# Altium PCB Embedded-DCAC-UPS-PoC.PcbDoc (part 2 of 2)
Units mm, origin at the board's own origin, x right, y up, seen from the top; angles counter-clockwise.
Board outline 165 x 165 mm, 2 copper layers (Top Layer, Bottom Layer), stack 1.58 mm thick; 80 components, 51 nets, 294 pads, 58 vias.
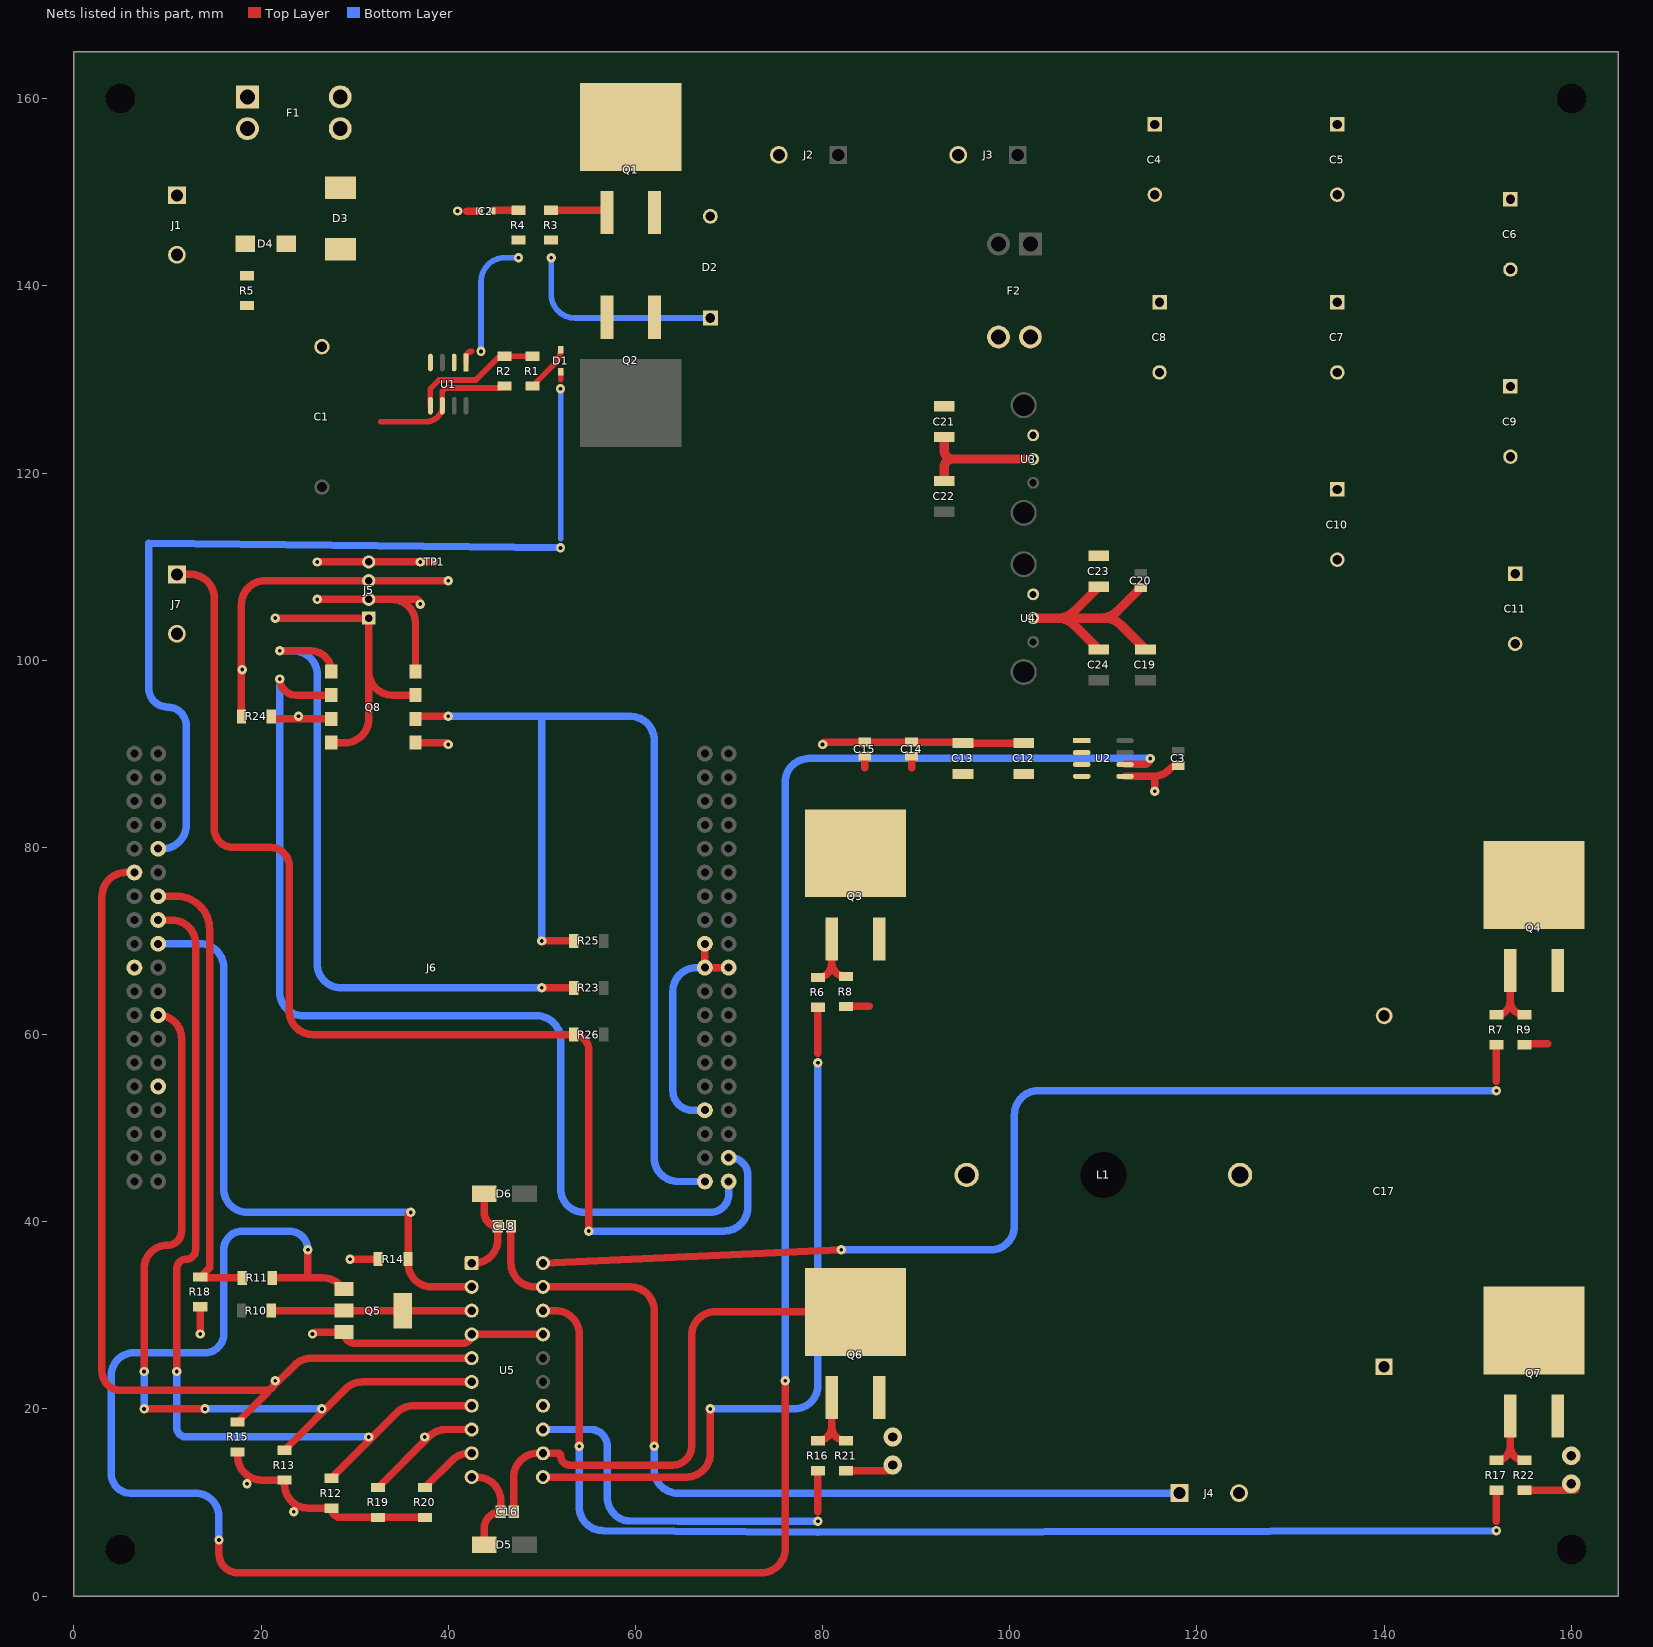
[diagram p2: the nets of this part, all layers, seen from the top]

## Via types
v1: diameter 1, hole 0.4, Top Layer to Bottom Layer, 54 vias
v2: diameter 2, hole 1, Top Layer to Bottom Layer, 4 vias

## Nets (pads, with @x,y where several pads share a name; then routed paths per layer and width w, separated by ;. In a path a pad name is that pad's centre, name@x,y a point inside that pad or via, vN(x,y) a via of type N, cw(c..) or ccw(c..) an arc to the next point about the centre after c; other vN are vias at no path point) (continued)
BAT_OUT-: C3.2 C4.1 C5.1 C6.1 C7.1 C8.1 C9.1 C10.1 C11.1 C12.2 C13.2 C14.1 C15.1 C19.2 C20.1 C21.1 C22.1 C23.1 C24.1 J3.2 J6.8 J6.19 J6.20 J6.22 J6.47 J6.58 J7.2 Q5.3 Q6.3 Q7.3 Q8.5 R12.1 R13.1 R14.1 R15.1 R18.2 R19.2 R20.2 R21.2 R22.2 U2.5 U3.2 U4.2 U5.4 U5.14 U5.17 | length 168.4
  Top Layer w0.8: 13.5,28.5 R18.2@13.5,30.9 ; R15.1@17.5,15.4 17.5,14.94 ccw(c20.04,14.94) 20.04,12.4 R13.1@22.5,12.4 22.5,11.94 ccw(c25.04,11.94) 25.04,9.4 R12.1@27.5,9.4 ccw(c28.5,9.4) 28.5,8.4 R19.2@32.5,8.4 R20.2@37.5,8.4 ; v1(25.5,28) cw(c25.983,27.517) 25.983,28.2 Q5.3@28.85,28.2 ccw(c30.05,28.2) 30.05,27 41.54,27 ccw(c41.54,27.96) U5.4@42.5,27.96 U5.17@50.12,27.96 ; v1(29.5,36) R14.1@32.5,36 ; Q8.5@36.5,91.19 39.81,91.19 cw(c39.81,91) v1(40,91) ; J6.22@67.42,69.7 J6.20@67.42,67.16 J6.19@69.96,67.16 ; v1(80,91) cw(c80.25,91) 80.25,91.25 C15.1@84.5,91.25 C14.1@89.5,91.25 94.9,91.25 cw(c94.9,91.15) C13.2@95,91.15 C12.2@101.5,91.15 ; R21.2@82.5,13.4 86.9,13.4 ccw(c86.9,14) v2(87.5,14) ; U2.5@112.316,87.595 115.293,87.595 ; v1(115.5,86) 115.5,87.095 ccw(c114.793,87.095) 115.293,87.595 ; C3.2@117.5,88.75 117.089,88.339 cw(c115.293,90.135) 115.293,87.595 ; R22.2@155,11.3 160.3,11.3 ccw(c160.3,11.5) v2@160.5,11.5
  Top Layer w1: C22.1@93,119.15 93,120.65 cw(c93.85,120.65) 93.85,121.5 ; C21.1@93,123.85 93,122.35 ccw(c93.85,122.35) 93.85,121.5 ; U4.2@102.5,104.5 110.098,104.5 cw(c110.098,101.96) 111.894,103.756 C19.2@114.5,101.15 ; U3.2@102.5,121.5 93.85,121.5 ; C24.1@109.5,101.15 106.894,103.756 ccw(c105.098,101.96) 105.098,104.5 ccw(c105.098,107.04) 106.894,105.244 C23.1@109.5,107.85 ; 110.093,104.531 ccw(c109.698,107.04) 111.494,105.244 C20.1@114,107.75
  Bottom Layer w0.8: J6.8@67.42,51.92 66.08,51.92 cw(c66.08,54) 64,54 64,64.62 cw(c66.54,64.62) 66.54,67.16 J6.20@67.42,67.16
  other v1: 23.5,9 18.5,12 13.5,28
  other v2: 160,12 160,15 87.5,17
BRIDGE_EN: J6.63 R11.1 R18.1 | length 49.7
  Top Layer w0.8: J6.63@9,74.78 10.96,74.78 cw(c10.96,71.24) 14.5,71.24 14.5,35.1 13.85,34.45 13.85,34.2 13.75,34.1 R18.1@13.5,34.1 ccw(c13.741,34.341) 13.741,34 R11.1@18,34
BUT_CTRL: J6.3 J7.1 R26.2 | length 134.6
  Top Layer w0.8: J7.1@11,109.175 12.46,109.175 cw(c12.46,106.635) 15,106.635 15,82 ccw(c17,82) 17,80 21,80 cw(c21,78) 23,78 23,62.54 ccw(c25.54,62.54) 25.54,60 R26.2@53.4,60 cw(c53.4,58.4) 55,58.4 v1(55,39)
  Bottom Layer w0.8: v1(55,39) 69.46,39 ccw(c69.46,41.54) 72,41.54 72,45 ccw(c70.16,45) 70.16,46.84 J6.3@69.96,46.84
CHG_CTRL: D1.2 J6.67 | length 97.6
  Top Layer w0.6: 52,130 D1.2@52,130.8
  Bottom Layer w0.6: 52,113 v1(52,129)
  Bottom Layer w0.8: J6.67@9,79.86 9.46,79.86 ccw(c9.46,82.4) 12,82.4 12,93 ccw(c10,93) 10,95 cw(c10,97) 8,97 8,112.5 v1(52,112)
FAULT_ACS: Q5.1 R11.2 U2.6 | length 262.9
  Top Layer w0.8: v1(15.5,6) 15.5,4.5 ccw(c17.5,4.5) 17.5,2.5 73.46,2.5 ccw(c73.46,5.04) 76,5.04 v1(76,23) ; R11.2@21.2,34 25,34 ; v1(25,37) 25,34 ; Q5.1@28.85,32.8 28.394,33.256 ccw(c26.598,31.46) 26.598,34 25,34 ; U2.6@112.316,88.865 114.365,88.865 ccw(c114.365,89.5) v1(115,89.5)
  Bottom Layer w0.8: v1(15.5,6) 15.5,8.46 ccw(c12.96,8.46) 12.96,11 6.041,11 cw(c6.041,13.041) 4,13.041 4,23.583 cw(c6.417,23.583) 6.417,26 14,26 ccw(c14,28) 16,28 16,36.96 cw(c18.04,36.96) 18.04,39 23,39 cw(c23,37) v1(25,37) ; v1(76,23) 76,86.96 cw(c78.54,86.96) 78.54,89.5 v1(115,89.5)
JBD_GND: J5.1 Q8.4 Q8.7 | length 32.7
  Top Layer w0.8: v1(21.5,104.5) J5.1@31.5,104.5 31.5,98.81 ; Q8.4@27.5,91.19 28.96,91.19 ccw(c28.96,93.73) 31.5,93.73 31.5,98.81 ; Q8.7@36.5,96.27 34.04,96.27 cw(c34.04,98.81) 31.5,98.81
JBD_RXD: J5.2 Q8.8 | length 20.4
  Top Layer w0.8: v1(26,106.5) J5.2@31.5,106.5 33.96,106.5 ; Q8.8@36.5,98.81 36.5,103.96 ccw(c33.96,103.96) 33.96,106.5 ; v1(37,106) ccw(c36.5,106) 36.5,106.5 33.96,106.5
JBD_TXD: J5.3 R24.1 | length 35.5
  Top Layer w0.8: R24.1@17.9,94 17.9,105.96 cw(c20.44,105.96) 20.44,108.5 J5.3@31.5,108.5 v1(40,108.5)
  other v1: 18,99
NetC1_2: C1.2 D4.1 R2.2 R5.1 U1.6 | length 15.9
  Top Layer w0.6: 32.799,125.5 37.678,125.5 ccw(c37.678,127.187) U1.6@39.365,127.187 39.365,128.741 39.716,129.092 45.199,129.092 45.207,129.1 45.8,129.1 R2.2@46,129.3
NetC2_1: C2.1 R4.2 | length 2.8
  Top Layer w0.6: C2.1@44.7,148 C2.1@44.8,148.1
  Top Layer w0.8: C2.1@44.8,148.1 R4.2@47.5,148.1
NetC4_2: C4.2 C5.2 C6.2 C7.2 C8.2 C9.2 C10.2 C11.2 C21.2 C23.2 F2.2 U2.1 U2.2 U3.1 U4.1
NetC12_1: C12.1 C13.1 C14.2 C15.2 Q3.4 Q4.4 U2.3 U2.4 | length 2.5
  Top Layer w0.8: 84.5,88.5 C15.2@84.5,89.75 ; 89.5,88.5 C14.2@89.5,89.75
NetC16_1: C16.1 D5.1 U5.10 | length 10.2
  Top Layer w0.8: U5.10@42.5,12.72 43.06,12.72 cw(c43.06,10.18) 45.6,10.18 C16.1@45.6,9 ccw(c45.6,7.25) 43.85,7.25 D5.1@43.85,5.5
NetC17_1: C17.1 J4.2 L1.2
NetC18_1: C18.1 D6.1 U5.1 | length 10
  Top Layer w0.8: U5.1@42.5,35.58 42.76,35.58 ccw(c42.76,38.12) 45.3,38.12 C18.1@45.3,39.5 cw(c45.3,40.95) 43.85,40.95 D6.1@43.85,43
NetD1_1: D1.1 R1.1 | length 5
  Top Layer w0.6: R1.1@49,129.3 51.364,131.664 ccw(c49.827,133.2) D1.1@52,133.2
NetD2_1: D2.1 Q2.1 R3.1 R4.1 U1.1 | length 36.8
  Top Layer w0.6: U1.1@41.905,131.813 41.905,132.405 cw(c42.5,132.405) 42.5,133
  Bottom Layer w0.6: v1(43.5,133) 43.5,140.46 cw(c46.04,140.46) 46.04,143 v1(47.5,143) ; v1(51,143) 51,139.102 ccw(c53.54,139.102) 53.54,136.562 D2.1@68,136.562
NetD2_2: D2.2 Q1.3 Q2.3 U1.2
NetD3_1: D3.1 F1.2 Q1.4 U1.4
NetD3_2: D3.2 D4.2
NetJ5_4: J5.4 TP1.1 | length 12.5
  Top Layer w0.8: v1(26,110.5) J5.4@31.5,110.5 v1(37,110.5) TP1.1@38.5,110.5
NetQ1_1: Q1.1 R3.2 | length 6.1
  Top Layer w0.6: Q1.1@56.71,148.1 Q1.1@56.96,147.85
  Top Layer w0.8: R3.2@51,148.1 Q1.1@56.71,148.1
NetQ3_1: Q3.1 R6.1 R8.1 | length 7.2
  Top Layer w0.8: R6.1@79.5,66.1 ccw(c79.5,67.56) 80.96,67.56 ; Q3.1@80.96,70.225 80.96,67.74 ccw(c82.5,67.74) R8.1@82.5,66.2
NetQ4_1: Q4.1 R7.1 R9.1 | length 7.9
  Top Layer w0.8: R7.1@152,62.1 ccw(c152,63.56) 153.46,63.56 ; Q4.1@153.46,66.85 153.46,63.64 ccw(c155,63.64) R9.1@155,62.1
NetQ5_2: Q5.2 Q5.4 R10.2 U5.3 | length 21.4
  Top Layer w0.8: R10.2@21.1,30.5 Q5.2@28.85,30.5 Q5.4@35.15,30.5 ; Q5.4@35.3,30.85 ccw(c35.65,30.85) 35.65,30.5 U5.3@42.5,30.5
NetQ6_1: Q6.1 R16.1 R21.1 | length 7.8
  Top Layer w0.8: R16.1@79.5,16.6 ccw(c79.5,18.06) 80.96,18.06 ; Q6.1@80.96,21.225 80.96,18.14 ccw(c82.5,18.14) R21.1@82.5,16.6
NetQ7_1: Q7.1 R17.1 R22.1 | length 7.9
  Top Layer w0.8: R17.1@152,14.5 ccw(c152,15.96) 153.46,15.96 ; Q7.1@153.46,19.225 153.46,16.04 ccw(c155,16.04) R22.1@155,14.5
NetQ8_1: Q8.1 R23.2 | length 72
  Top Layer w0.8: v1(22,101) 25.31,101 cw(c25.31,98.81) Q8.1@27.5,98.81 ; v1(50,65) R23.2@53.4,65
  Bottom Layer w0.8: v1(22,101) 23.46,101 cw(c23.46,98.46) 26,98.46 26,67.54 ccw(c28.54,67.54) 28.54,65 v1(50,65)
NetQ8_3: Q8.3 R24.2 | length 6.6
  Top Layer w0.8: R24.2@21.1,94 ccw(c21.37,94) 21.37,93.73 Q8.3@27.5,93.73
  other v1: 24,94
NetR1_2: R1.2 R2.1 U1.5 | length 13.9
  Top Layer w0.6: U1.5@38.095,127.187 38.095,129.025 39.016,129.946 42.937,129.946 45.291,132.3 R2.1@45.8,132.3 ; R2.1@46,132.5 R1.2@49,132.5
NetR19_1: R19.1 U5.8 | length 12.5
  Top Layer w0.8: R19.1@32.5,11.6 37.956,17.056 cw(c39.752,15.26) 39.752,17.8 U5.8@42.5,17.8
  other v1: 37.5,17
NetR20_1: R20.1 U5.9 | length 6.4
  Top Layer w0.8: R20.1@37.5,11.6 40.416,14.516 cw(c42.212,12.72) 42.212,15.26 U5.9@42.5,15.26
PWM_A_HIGH: J6.61 R12.2 U5.7 | length 97.5
  Top Layer w0.8: J6.61@9,72.24 10.46,72.24 cw(c10.46,69.7) 13,69.7 13,37 cw(c12,37) 12,36 ccw(c12,35) 11,35 v1(11,24) ; R12.2@27.5,12.6 34.496,19.596 cw(c36.292,17.8) 36.292,20.34 U5.7@42.5,20.34
  Bottom Layer w0.8: v1(11,24) 11,18 ccw(c12,18) 12,17 v1(31.5,17)
PWM_A_LOW: J6.53 R13.2 U5.6 | length 87.7
  Top Layer w0.8: v1(7.5,20) v1(14,20) ; v1(7.5,24) 7.5,35 cw(c10,35) 10,37.5 ccw(c10,39) 11.5,39 11.5,59.58 ccw(c9,59.58) J6.53@9,62.08 ; R13.2@22.5,15.6 29.036,22.136 cw(c30.832,20.34) 30.832,22.88 U5.6@42.5,22.88
  Bottom Layer w0.8: v1(7.5,20) v1(7.5,24) ; v1(14,20) v1(26.5,20)
PWM_B_HIGH: J6.59 R14.2 U5.2 | length 67.4
  Top Layer w0.8: v1(36,41) ccw(c36,40.7) 35.7,40.7 R14.2@35.7,36 35.7,35.58 ccw(c38.24,35.58) 38.24,33.04 U5.2@42.5,33.04
  Bottom Layer w0.8: J6.59@9,69.7 13.46,69.7 cw(c13.46,67.16) 16,67.16 16,43.54 ccw(c18.54,43.54) 18.54,41 v1(36,41)
PWM_B_LOW: J6.66 R15.2 U5.5 | length 102.2
  Top Layer w0.8: J6.66@6.46,77.32 5.54,77.32 ccw(c5.54,74.78) 3,74.78 3,24 ccw(c5,24) 5,22 20.5,22 ccw(c20.5,23) v1(21.5,23) ; R15.2@17.5,18.6 20.7,21.8 ; v1@21.7,22.8 23.576,24.676 cw(c25.372,22.88) 25.372,25.42 U5.5@42.5,25.42
Q_AHO: R6.2 U5.11 | length 76.4
  Top Layer w0.8: U5.11@50.12,12.72 65.46,12.72 ccw(c65.46,15.26) 68,15.26 v1(68,20) ; 79.5,58 R6.2@79.5,62.9
  Bottom Layer w0.8: v1(68,20) 76.96,20 ccw(c76.96,22.54) 79.5,22.54 v1(79.5,57)
Q_ALO: R16.2 U5.13 | length 41.7
  Top Layer w0.8: 79.5,9 R16.2@79.5,13.4
  Bottom Layer w0.8: U5.13@50.12,17.8 55.2,17.8 cw(c55.2,16) 57,16 57,10.54 ccw(c59.54,10.54) 59.026,8.052 ccw(c59.186,8.836) 59.179,8.036 64.592,8 ccw(c64.598,8.8) 64.598,8 v1(79.5,8)
Q_BHO: R7.2 U5.20 | length 120.6
  Top Layer w0.8: U5.20@50.12,35.58 v1(82,37) ; 152,55 R7.2@152,58.9
  Bottom Layer w0.8: v1(82,37) 97.96,37 ccw(c97.96,39.54) 100.5,39.54 100.5,51.46 cw(c103.04,51.46) 103.04,54 v1(152,54)
Q_BLO: R17.2 U5.18 | length 126.5
  Top Layer w0.8: U5.18@50.12,30.5 51.46,30.5 cw(c51.46,27.96) 54,27.96 v1(54,16) ; 152,8 R17.2@152,11.3
  Bottom Layer w0.8: v1(54,16) 54,9.54 ccw(c56.54,9.54) 56.54,7 cw(c56.54,6.2) 56.545,7 79.492,6.846 ccw(c79.5,8) 79.502,6.846 v1(152,7)
SW_A: C16.2 L1.1 Q3.3 Q6.4 R8.2 U5.12 | length 59.3
  Top Layer w0.8: C16.2@47,9 47,12.72 cw(c49.54,12.72) 49.54,15.26 U5.12@50.12,15.26 51.74,15.26 cw(c51.74,15) 52,15 ccw(c53,15) 53,14 64,14 ccw(c64,16) 66,16 66,27.835 cw(c68.54,27.835) 68.54,30.375 Q6.4@83.5,30.375 ; R8.2@82.5,63 85,63
SW_B: C17.2 C18.2 J4.1 Q4.3 Q7.4 R9.2 U5.19 | length 99.2
  Top Layer w0.8: C18.2@46.7,39.5 46.7,35.58 ccw(c49.24,35.58) 49.24,33.04 U5.19@50.12,33.04 59.46,33.04 cw(c59.46,30.5) 62,30.5 v1(62,16) ; R9.2@155,58.9 cw(c155.1,58.9) 155.1,59 157.5,59
  Bottom Layer w0.8: v1(62,16) 62,13.54 ccw(c64.54,13.54) 64.54,11 J4.1@118.15,11
USART3_RX: J6.2 Q8.6 R25.2 | length 106
  Top Layer w0.8: Q8.6@36.5,93.73 cw(c36.77,93.73) 36.77,94 v1(40,94) ; v1(50,70) R25.2@53.4,70
  Bottom Layer w0.8: v1(40,94) 50,94 ; v1(50,70) 50,94 ; J6.2@67.42,44.3 64.54,44.3 cw(c64.54,46.84) 62,46.84 62,91.46 ccw(c59.46,91.46) 59.46,94 50,94
USART3_TX: J6.1 Q8.2 | length 110.6
  Top Layer w0.8: v1(22,98) ccw(c23.73,98) 23.73,96.27 Q8.2@27.5,96.27
  Bottom Layer w0.8: v1(22,98) 22,64.54 ccw(c24.54,64.54) 24.54,62 49.46,62 cw(c49.46,59.46) 52,59.46 52,43.54 ccw(c54.54,43.54) 54.54,41 68,41 ccw(c68,42.96) 69.96,42.96 J6.1@69.96,44.3
VIN+: F1.1 J1.1
VIN-: C2.2 J1.2 J2.2 R5.2 | length 1.3
  Top Layer w0.8: 42,148 C2.2@43.3,148
  other v1: 41,148
pads on no net: J6.4 J6.5 J6.7 J6.9 J6.10 J6.11 J6.12 J6.13 J6.14 J6.15 J6.17 J6.18 J6.21 J6.23 J6.24 J6.25 J6.26 J6.27 J6.28 J6.29 J6.30 J6.31 J6.32 J6.33 J6.34 J6.35 J6.36 J6.37 J6.38 J6.39 J6.40 J6.41 J6.42 J6.43 J6.44 J6.45 J6.46 J6.48 J6.49 J6.50 J6.51 J6.52 J6.54 J6.55 J6.56 J6.57 J6.60 J6.62 J6.64 J6.65 J6.68 J6.69 J6.70 J6.71 J6.72 J6.73 J6.74 J6.75 J6.76 L1.3 U1.3 U1.7 U2.7 U3.4 U3.5 U4.4 U4.5

## Polygon pours and split planes (outlines as drawn)
BAT_OUT- on Bottom Layer "BAT_OUT-_L02_P004" (solid, pour order 4): 93.54,162 ccw(c93.54,159.46) 91,159.46 91,114.54 cw(c88.46,114.54) 88.46,112 4.54,112 ccw(c4.54,109.46) 2,109.46 2,12.54 ccw(c4.54,12.54) 4.54,10 9.46,10 cw(c9.46,7.46) 12,7.46 12,4.54 ccw(c14.54,4.54) 14.54,2 150.46,2 ccw(c150.46,4.54) 153,4.54 153,7.46 cw(c155.54,7.46) 155.54,10 160.46,10 ccw(c160.46,12.54) 163,12.54 163,152.46 ccw(c160.46,152.46) 160.46,155 155,155 cw(c155,157) 153,157 153,161 ccw(c152,161) 152,162 134,162
VIN- on Bottom Layer "VIN-_L02_P000" (solid, pour order 0): 3,150.46 cw(c5.54,150.46) 5.54,153 14.5,153 ccw(c14.5,154) 15.5,154 15.5,161 cw(c16.5,161) 16.5,162 83.46,162 cw(c83.46,159.46) 86,159.46 86,119.54 cw(c83.46,119.54) 83.46,117 5.54,117 cw(c5.54,119.54) 3,119.54 3,140
NetC4_2 on Top Layer "NETC4_2_L01_P001" (solid, pour order 1): 93.54,162 ccw(c93.54,159.46) 91,159.46 91,92.54 ccw(c93.54,92.54) 93.54,90 109,90 ccw(c109,91) 110,91 110,93 cw(c112,93) 112,95 159.46,95 ccw(c159.46,97.54) 162,97.54 162,151.46 ccw(c159.46,151.46) 159.46,154 149.54,154 cw(c149.54,156.54) 147,156.54 147,159.46 ccw(c144.46,159.46) 144.46,162 121,162

## Other copper
Top Layer:
  region net VIN+: 8,153 ccw(c8,152) 7,152 7,149 ccw(c8,149) 8,148 21,148 ccw(c21,149) 22,149 22,161 ccw(c21,161) 21,162 16.5,162 ccw(c16.5,161) 15.5,161 15.5,153
  region net PWM_A_LOW: 15,20 ccw(c14,20) 14,21 ccw(c14,20) 13,20 ccw(c14,20) 14,19 ccw(c14,20)
  region net PWM_A_LOW: 8.5,20 ccw(c7.5,20) 7.5,21 ccw(c7.5,20) 6.5,20 ccw(c7.5,20) 7.5,19 ccw(c7.5,20)
  region net PWM_A_LOW: 8.5,24 ccw(c7.5,24) 7.5,25 ccw(c7.5,24) 6.5,24 ccw(c7.5,24) 7.5,23 ccw(c7.5,24)
  region net PWM_A_HIGH: 12,24 ccw(c11,24) 11,25 ccw(c11,24) 10,24 ccw(c11,24) 11,23 ccw(c11,24) 12,24
  region net FAULT_ACS: 26,37 ccw(c25,37) 25,38 ccw(c25,37) 24,37 ccw(c25,37) 25,36 ccw(c25,37) 26,37
  region net FAULT_ACS: 16.5,6 ccw(c15.5,6) 15.5,7 ccw(c15.5,6) 14.5,6 ccw(c15.5,6) 15.5,5 ccw(c15.5,6)
  region net FAULT_ACS: 77,23 ccw(c76,23) 76,24 ccw(c76,23) 75,23 ccw(c76,23) 76,22 ccw(c76,23)
  region net 3V3_STM32: 76,93 ccw(c75,93) 75,94 ccw(c75,93) 74,93 ccw(c75,93) 75,92 ccw(c75,93)
  region net SW_B: 63,16 ccw(c62,16) 62,17 ccw(c62,16) 61,16 ccw(c62,16) 62,15 ccw(c62,16)
  region net Q_BLO: 55,16 ccw(c54,16) 54,17 ccw(c54,16) 53,16 ccw(c54,16) 54,15 ccw(c54,16) 55,16
  region net Q_BHO: 81,37 cw(c82,37) 82,38 cw(c82,37) 83,37 cw(c82,37) 82,36 cw(c82,37)
  region net Q_AHO: 69,20 ccw(c68,20) 68,21 ccw(c68,20) 67,20 ccw(c68,20) 68,19 ccw(c68,20) 69,20
  region net SW_B: 105,32 105,36.96 cw(c107.54,36.96) 107.54,39.5 141.46,39.5 ccw(c141.46,42.04) 144,42.04 144,46.5 154.5,46.5 154.5,32
  region net SW_B: 147,27 124.54,27 ccw(c124.54,24.46) 122,24.46 122,9.5 cw(c120.5,9.5) 120.5,8 107,8 cw(c107,10) 105,10 105,33 cw(c106,33) 106,34 141.5,34 ccw(c141.5,36.5) 144,36.5 144,47 154.5,47
  region net SW_B: 151,24.46 ccw(c148.46,24.46) 148.46,27 151,27
  region net BAT_OUT-: 81,91 ccw(c80,91) 80,92 ccw(c80,91) 79,91 ccw(c80,91) 80,90 ccw(c80,91)
  region net NetC12_1: 110,86 ccw(c112,86) 112,84 110,84
  region net NetC12_1: 99,75 cw(c99,72.923) 101.077,72.923 101.077,74.923 ccw(c101,74.923) 101,75
  region net NetC12_1: 109,84 159,84 cw(c159,81.5) 161.5,81.5 161.5,74 cw(c159,74) 159,71.5 103,71.5 cw(c103,73.5) 101,73.5 101,78
  region net NetC12_1: 110,88 ccw(c109,88) 109,89 79,89 ccw(c79,88) 78,88 78,76 ccw(c79,76) 79,75 109,75 ccw(c109,76) 110,76
  region net BUT_CTRL: 56,39 ccw(c55,39) 55,40 ccw(c55,39) 54,39 ccw(c55,39) 55,38 ccw(c55,39)
  region net 12V_DRIVER: 50,9 ccw(c49,9) 49,10 ccw(c49,9) 48,9 ccw(c49,9) 49,8 ccw(c49,9) 50,9
  region net 12V_DRIVER: 50,40 ccw(c49,40) 49,41 ccw(c49,40) 48,40 ccw(c49,40) 49,39 ccw(c49,40)
  region net PWM_B_HIGH: 37,41 ccw(c36,41) 36,42 ccw(c36,41) 35,41 ccw(c36,41) 36,40 ccw(c36,41)
  region net USART3_RX: 51,70 ccw(c50,70) 50,71 ccw(c50,70) 49,70 ccw(c50,70) 50,69 ccw(c50,70)
  region net NetQ8_1: 51,65 ccw(c50,65) 50,66 ccw(c50,65) 49,65 ccw(c50,65) 50,64 ccw(c50,65)
  region net SW_B: 157,56 157,53.54 cw(c154.46,53.54) 154.46,51 150.54,51 cw(c150.54,53.54) 148,53.54 148,60.96 ccw(c145.46,60.96) 145.46,63.5 134.54,63.5 ccw(c134.54,60.96) 132,60.96 132,52.54 ccw(c134.54,52.54) 134.54,50 142,50 cw(c142,48) 144,48 144,29.54 ccw(c146.54,29.54) 146.54,27 161.5,27
  region net Q_BHO: 152,55 ccw(c152,54) 151,54 ccw(c152,54) 152,53 ccw(c152,54) 153,54 ccw(c152,54)
  region net Q_BLO: 152,8 ccw(c152,7) 151,7 ccw(c152,7) 152,6 ccw(c152,7) 153,7 ccw(c152,7)
  region net Q_ALO: 79.5,9 ccw(c79.5,8) 78.5,8 ccw(c79.5,8) 79.5,7 ccw(c79.5,8) 80.5,8 ccw(c79.5,8)
  region net Q_AHO: 79.5,58 ccw(c79.5,57) 78.5,57 ccw(c79.5,57) 79.5,56 ccw(c79.5,57) 80.5,57 ccw(c79.5,57)
  region net BAT_OUT-: 41,91 ccw(c40,91) 40,92 ccw(c40,91) 39,91 ccw(c40,91) 40,90 ccw(c40,91)
  region net USART3_RX: 41,94 ccw(c40,94) 40,95 ccw(c40,94) 39,94 ccw(c40,94) 40,93 ccw(c40,94)
  region net USART3_TX: 23,98 ccw(c22,98) 22,99 ccw(c22,98) 21,98 ccw(c22,98) 22,97 ccw(c22,98)
  region net NetQ8_1: 23,101 ccw(c22,101) 22,102 ccw(c22,101) 21,101 ccw(c22,101) 22,100 ccw(c22,101)
  region net JBD_GND: 22.5,104.5 ccw(c21.5,104.5) 21.5,105.5 ccw(c21.5,104.5) 20.5,104.5 ccw(c21.5,104.5) 21.5,103.5 ccw(c21.5,104.5)
  region net JBD_TXD: 19,99 ccw(c18.02,99) 18.02,99.98 17.9,99.98 ccw(c17.9,99.08) 17,99.08 17,99 ccw(c18,99) 18,98 ccw(c18,99)
  region net JBD_RXD: 27,106.5 ccw(c26,106.5) 26,107.5 ccw(c26,106.5) 25,106.5 ccw(c26,106.5) 26,105.5 ccw(c26,106.5)
  region net JBD_RXD: 35.5,106.5 cw(c35.5,105.5) 36.5,105.5
  region net JBD_RXD: 37,107 ccw(c37,106) 36,106 ccw(c37,106) 37,105 ccw(c37,106) 38,106 ccw(c37,106)
  region net JBD_TXD: 40,109.5 ccw(c40,108.5) 39,108.5 ccw(c40,108.5) 40,107.5 ccw(c40,108.5) 41,108.5 ccw(c40,108.5)
  region net NetQ8_3: 25,94 ccw(c24,94) 24,95 ccw(c24,94) 23,94 ccw(c24,94) 24,93 ccw(c24,94)
  region net NetJ5_4: 38,110.5 ccw(c37,110.5) 37,111.5 ccw(c37,110.5) 36,110.5 ccw(c37,110.5) 37,109.5 ccw(c37,110.5)
  region net NetJ5_4: 26,111.5 ccw(c26,110.5) 25,110.5 ccw(c26,110.5) 26,109.5 ccw(c26,110.5) 27,110.5 ccw(c26,110.5)
  region net FAULT_ACS: 115,90.5 ccw(c115,89.5) 114,89.5 ccw(c115,89.5) 115,88.5 ccw(c115,89.5) 116,89.5 ccw(c115,89.5)
  region net PWM_A_HIGH: 32.5,17 ccw(c31.5,17) 31.5,18 ccw(c31.5,17) 30.5,17 ccw(c31.5,17) 31.5,16 ccw(c31.5,17)
  region net BAT_OUT-: 19.5,12 ccw(c18.5,12) 18.5,13 ccw(c18.5,12) 17.5,12 ccw(c18.5,12) 18.5,11 ccw(c18.5,12)
  region net BAT_OUT-: 24.5,9 ccw(c23.5,9) 23.5,10 ccw(c23.5,9) 22.5,9 ccw(c23.5,9) 23.5,8 ccw(c23.5,9)
  region net BAT_OUT-: 158,22 ccw(c158,21) 157,21 157,11 ccw(c158,11) 158,10 162,10 ccw(c162,11) 163,11 163,21 ccw(c162,21) 162,22
  region net BAT_OUT-: 115.5,85 ccw(c115.5,86) 116.5,86 ccw(c115.5,86) 115.5,87 ccw(c115.5,86) 114.5,86 ccw(c115.5,86)
  region net BAT_OUT-: 29.5,37 ccw(c29.5,36) 28.5,36 ccw(c29.5,36) 29.5,35 ccw(c29.5,36) 30.5,36 ccw(c29.5,36)
  region net BAT_OUT-: 85.5,23.5 ccw(c85.5,22.5) 84.5,22.5 84.5,12.5 ccw(c85.5,12.5) 85.5,11.5 89.5,11.5 ccw(c89.5,12.5) 90.5,12.5 90.5,22.5 ccw(c89.5,22.5) 89.5,23.5
  region net BAT_OUT-: 26.5,28 ccw(c25.5,28) 25.5,29 ccw(c25.5,28) 24.5,28 ccw(c25.5,28) 25.5,27 ccw(c25.5,28)
  region net BAT_OUT-: 13.5,29 ccw(c13.5,28) 12.5,28 ccw(c13.5,28) 13.5,27 ccw(c13.5,28) 14.5,28 ccw(c13.5,28)
  region net PWM_A_LOW: 27.5,20 ccw(c26.5,20) 26.5,21 ccw(c26.5,20) 25.5,20 ccw(c26.5,20) 26.5,19 ccw(c26.5,20)
  region net NetR19_1: 38.5,17 ccw(c37.5,17) 37.5,18 ccw(c37.5,17) 36.5,17 ccw(c37.5,17) 37.5,16 ccw(c37.5,17)
  region net 12V_DRIVER: 19,26 ccw(c18,26) 18,27 ccw(c18,26) 17,26 ccw(c18,26) 18,25 ccw(c18,26)
  region net PWM_B_LOW: 22.5,23 ccw(c21.5,23) 21.5,24 ccw(c21.5,23) 20.5,23 ccw(c21.5,23) 21.5,22 ccw(c21.5,23)
  region net 3V3_STM32: 116.5,93 ccw(c115.5,93) 115.5,94 ccw(c115.5,93) 114.5,93 ccw(c115.5,93) 115.5,92 ccw(c115.5,93)
  region net CHG_CTRL: 52,130 ccw(c52,129) 51,129 ccw(c52,129) 52,128 ccw(c52,129) 53,129 ccw(c52,129) 52,130
  region net SW_B: 158,69 ccw(c158,68) 157,68 157,27.5 ccw(c157.5,27.5) 157.5,27 162,27 ccw(c162,28) 163,28 163,68 ccw(c162,68) 162,69
  region net SW_A: 84.939,72.939 ccw(c84.939,71.939) 83.939,71.939 83.939,26.939 ccw(c84.939,26.939) 84.939,25.939 96.939,25.939 ccw(c96.939,26.939) 97.939,26.939 97.939,72.061 ccw(c96.939,72.061) 96.939,73.061
  region net BAT_OUT+: 104,156 ccw(c102,156) 102,158 99,158 ccw(c99,156) 97,156 97,142 ccw(c99,142) 99,140 102,140 ccw(c102,142) 104,142
  region net NetD2_2: 41,131 cw(c40.5,131) 40.5,130.5 cw(c40.5,131) 40,131 40,136 41,136
  region net BAT_IN+: 54,129 cw(c52.5,129) 52.5,127.5 54,127.5
  region net BAT_IN+: 42,127.5 ccw(c42,127) 41.5,127 41.5,125.5 cw(c40,125.5) 40,124 40,122.5 ccw(c40.5,122.5) 40.5,122 55.5,122 ccw(c55.5,122.5) 56,122.5 56,127.5
  region net VIN-: 41,149 ccw(c41,148) 40,148 ccw(c41,148) 41,147 ccw(c41,148) 42,148 ccw(c41,148) 41,149
  region net VIN-: 8,145 ccw(c8,144) 7,144 7,135 ccw(c8,135) 8,134 19,134 ccw(c19,135) 20,135 20,138 ccw(c19,138) 19,139 16,139 cw(c16,140) 15,140 15,144 ccw(c14,144) 14,145
  region net BAT_IN+: 62,119 62,119.46 cw(c64.54,119.46) 64.54,122 61.5,122
  region net BAT_IN+: 54,126 cw(c52,126) 52,124 54,124
  region net BAT_IN+: 23.5,124 ccw(c23.5,122) 21.5,122 21.5,119 ccw(c23.5,119) 23.5,117 60,117 ccw(c60,119) 62,119 62,121.46 ccw(c59.46,121.46) 59.46,124 56,124
  region net NetD2_1: 47.5,146 ccw(c47.5,145) 46.5,145 46.5,143 ccw(c47.5,143) 47.5,142 51,142 ccw(c51,143) 52,143 52,145 ccw(c51,145) 51,146
  region net NetD2_1: 43.5,132 ccw(c43.5,133) 44.5,133 ccw(c43.5,133) 43.5,134 ccw(c43.5,133) 42.5,133 ccw(c43.5,133)
  region net NetC1_2: 34.697,125 37,125 ccw(c37,127.414) 38.707,125.707 39,126 cw(c37.793,127.207) 37.793,125.5 34,125.5
  region net NetC1_2: 36.5,126.803 36.5,126.5 ccw(c37.5,126.5) 37.5,125.5 36,125.5 cw(c36,125.586) 35.914,125.586
  region net NetC1_2: 31.5,130.5 ccw(c33,130.5) 33,129 31.5,129
  region net NetC1_2: 20,142.5 ccw(c21,142.5) 21,141.5 20,141.5
  region net NetC1_2: 20.5,140 cw(c20.5,139) 21.5,139 21.5,140
  region net NetC1_2: 18.5,140 21.5,140 21.5,127 ccw(c23.5,127) 23.5,125 34.5,125 ccw(c34.5,127) 36.5,127 36.5,127.5 ccw(c34.75,127.25) 34.5,129 31.5,129 31.5,139.5 ccw(c29.5,139.5) 29.5,141.5 18.9,141.5 ccw(c18.9,141.1) 18.5,141.1
  region net NetD2_2: 56.5,134.5 40,134.5 40,139 cw(c41,139) 41,140 56,140 cw(c56,139.5) 56.5,139.5
  region net BAT_IN+: 55,132 ccw(c55,131) 54,131 54,124 ccw(c55.625,123.375) 55,121.75 81.25,121.75 ccw(c81.25,126.52) 86.02,126.52 86.02,156.02 ccw(c83.515,156.497) 84,159 79,159 ccw(c79,158) 78,158 78,134.54 cw(c75.46,134.54) 75.46,132 56,132
  region net NetD2_2: 41,133.5 cw(c42,133.5) 42,134.5 41,134.5
  region net NetD2_2: 54,142 cw(c52,142) 52,140 54,140
  region net NetD2_1: 61,138 cw(c62,138) 62,139 68.5,139 cw(c68.5,138) 69.5,138 69.5,135.5 cw(c68.5,135.5) 68.5,134.5 62,134.5 cw(c62,135.5) 61,135.5
  region net NetD2_2: 61.789,140.5 68.5,140.5 ccw(c68.5,141.5) 69.5,141.5 69.5,149 ccw(c68.5,149) 68.5,150 60.289,150
  region net NetD2_2: 65,149 ccw(c64,149) 64,150 60,150 ccw(c60,149) 59,149 59,145 cw(c58,145) 58,144 55,144 ccw(c55,143) 54,143 54,136 ccw(c55.5,136) 55.5,134.5 59,134.5 ccw(c59,135.5) 60,135.5 60,137.96 cw(c62.54,137.96) 62.54,140.5 64,140.5 ccw(c64,141.5) 65,141.5
  region net NetD3_1: 52,156 cw(c52,154) 54,154 54,152.5 ccw(c54.5,152.5) 54.5,152 64.5,152 ccw(c64.5,152.5) 65,152.5 65,159.5 cw(c64.5,159.5) 64.5,159 52,159
  region net NetD3_1: 38.363,153 38.363,153.618 cw(c40.863,153.618) 40.863,156.118 40.863,157.5 36.137,157.5 36.137,153
  region net NetD3_1: 33,146.136 33,131 ccw(c34,131) 34,130 37.5,130 ccw(c37.5,131) 38.5,131 38.5,145.136
  region net NetD3_1: 30,148 31.5,148 cw(c31.5,146.5) 33,146.5 33,140 38.5,140 38.5,156.96 ccw(c35.96,156.96) 35.96,159.5 30,159.5
  region net VIN+: 15.5,155 15.5,154 cw(c14.5,154) 14.5,153 14.5,152 17.5,152 cw(c17.5,152.5) 17,152.5 17,156
  region net NetC1_2: 20,145 ccw(c19,145) 19,146 18,146 ccw(c18,145) 17,145 17,141 ccw(c18,141) 18,140 19,140 ccw(c19,141) 20,141
  region net NetD3_2: 30.495,146 cw(c30.5,145) 31.5,145 31.5,143.5 cw(c30.5,143.5) 30.5,142.5 22,142.5 cw(c22,143.5) 21,143.5 21,145 cw(c22,145) 22,146
  region net NetD3_1: 26.5,156 61.439,156 ccw(c63.114,156.867) 65,156.867 65,161 ccw(c64,161) 64,162 26.5,162
  region net NetD3_1: 27,162 31.5,162 31.5,149 cw(c30.5,149) 30.5,148 26.5,148 cw(c26.5,149) 25.5,149 25.5,161 cw(c26.5,161) 26.5,162 27.5,162
Bottom Layer:
  region net 12V_DRIVER: 72.5,52 72.5,51.5 ccw(c74,51.5) 74,50 74,51.5
  region net USART3_RX: 50,91.46 ccw(c47.46,91.46) 47.46,94 50,94
  region net USART3_RX: 50,91.46 cw(c52.54,91.46) 52.54,94 50,94
  region net CHG_CTRL: 8,110 cw(c10.5,110) 10.5,112.5 8,112.5
  region net CHG_CTRL: 52,113 cw(c52,112) 53,112 cw(c52,112) 52,111 cw(c52,112) 51,112 cw(c52,112)
  region net NetC17_1: 124,49 ccw(c124,47) 122,47 122,10 ccw(c124,10) 124,8 141,8 ccw(c141,10) 143,10 143,47 ccw(c141,47) 141,49

## Silkscreen, mask and mechanical layers (free items; w line width, h text height)
Top Overlay:
  lines w0.254: 1,9 9,9 9,1 ; 1,38 73,38 73,115 ; 1,115 88,115 88,164 ; 1,156 9,156 9,164 ; 156,1 156,9 164,9 ; 156,164 156,156 164,156 ; 1,1 164,1 164,164 1,164 1,1
  text "MH1" at 10,163 h1.2 r270
  text "-" at 70,161 h1.52
  text "+" at 85.5,161 h1.52
  text "MH2" at 155,159.5 h1.2 r90
  text "+" at 3,153.5 h1.52
  text "-" at 4.5,138 h1.52 r90
  text "INPUT STAGE" at 78,117.5 h1.52
  text "CONTROL STAGE" at 61.5,109.5 h1.52
  text "OUTPUT STAGE" at 74.5,109.5 h1.52
  text "DESIGNED BY  / YEVHENII KRAT" at 102.751,73.5 h3
  text "MH4" at 10,5.5 h1.2 r270
  text "MH3" at 155,2 h1.2 r90

## Text inside footprints (layer, text, board x,y; h text height)
J6: Top Overlay "CN7" at 71.42,41 h1.52 r180; Top Overlay "CN10" at 10.92,41 h1.52 r180